# Altium PCB PCB.PcbDoc (part 1 of 3)
Units mil, origin at the board's own origin, x right, y up, seen from the top; angles counter-clockwise.
Board outline 6000 x 4000 mil, 2 copper layers (Top Layer, Bottom Layer); 274 components, 212 nets, 893 pads, 35 vias.
Unrouted connection lines stored in the file: 511.
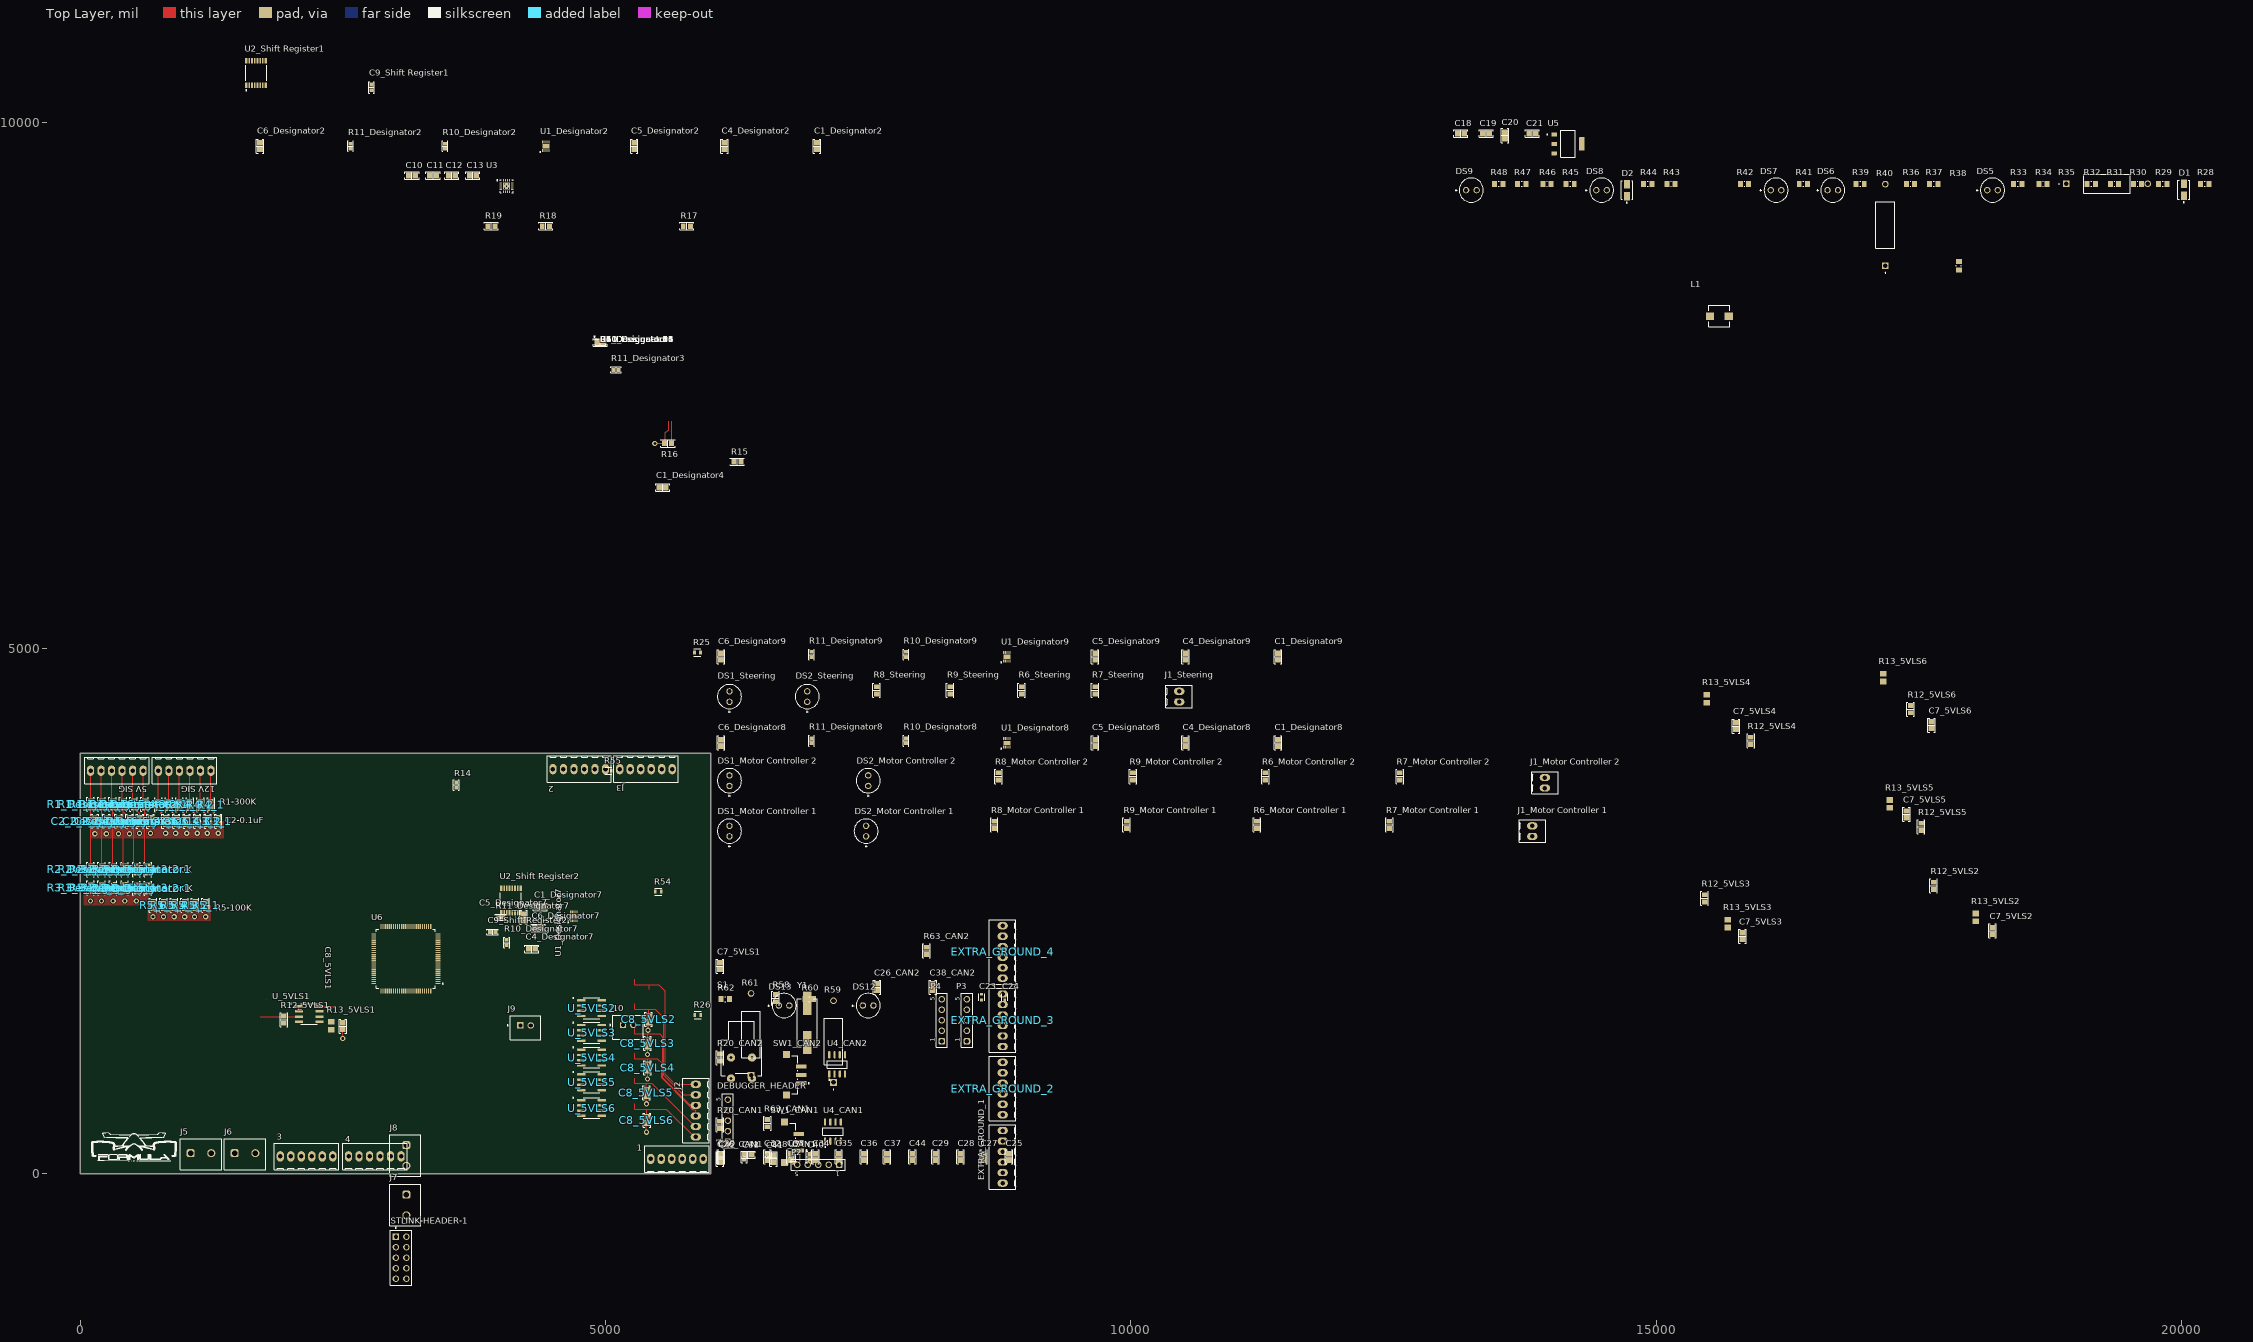
[diagram p0: Top Layer view]
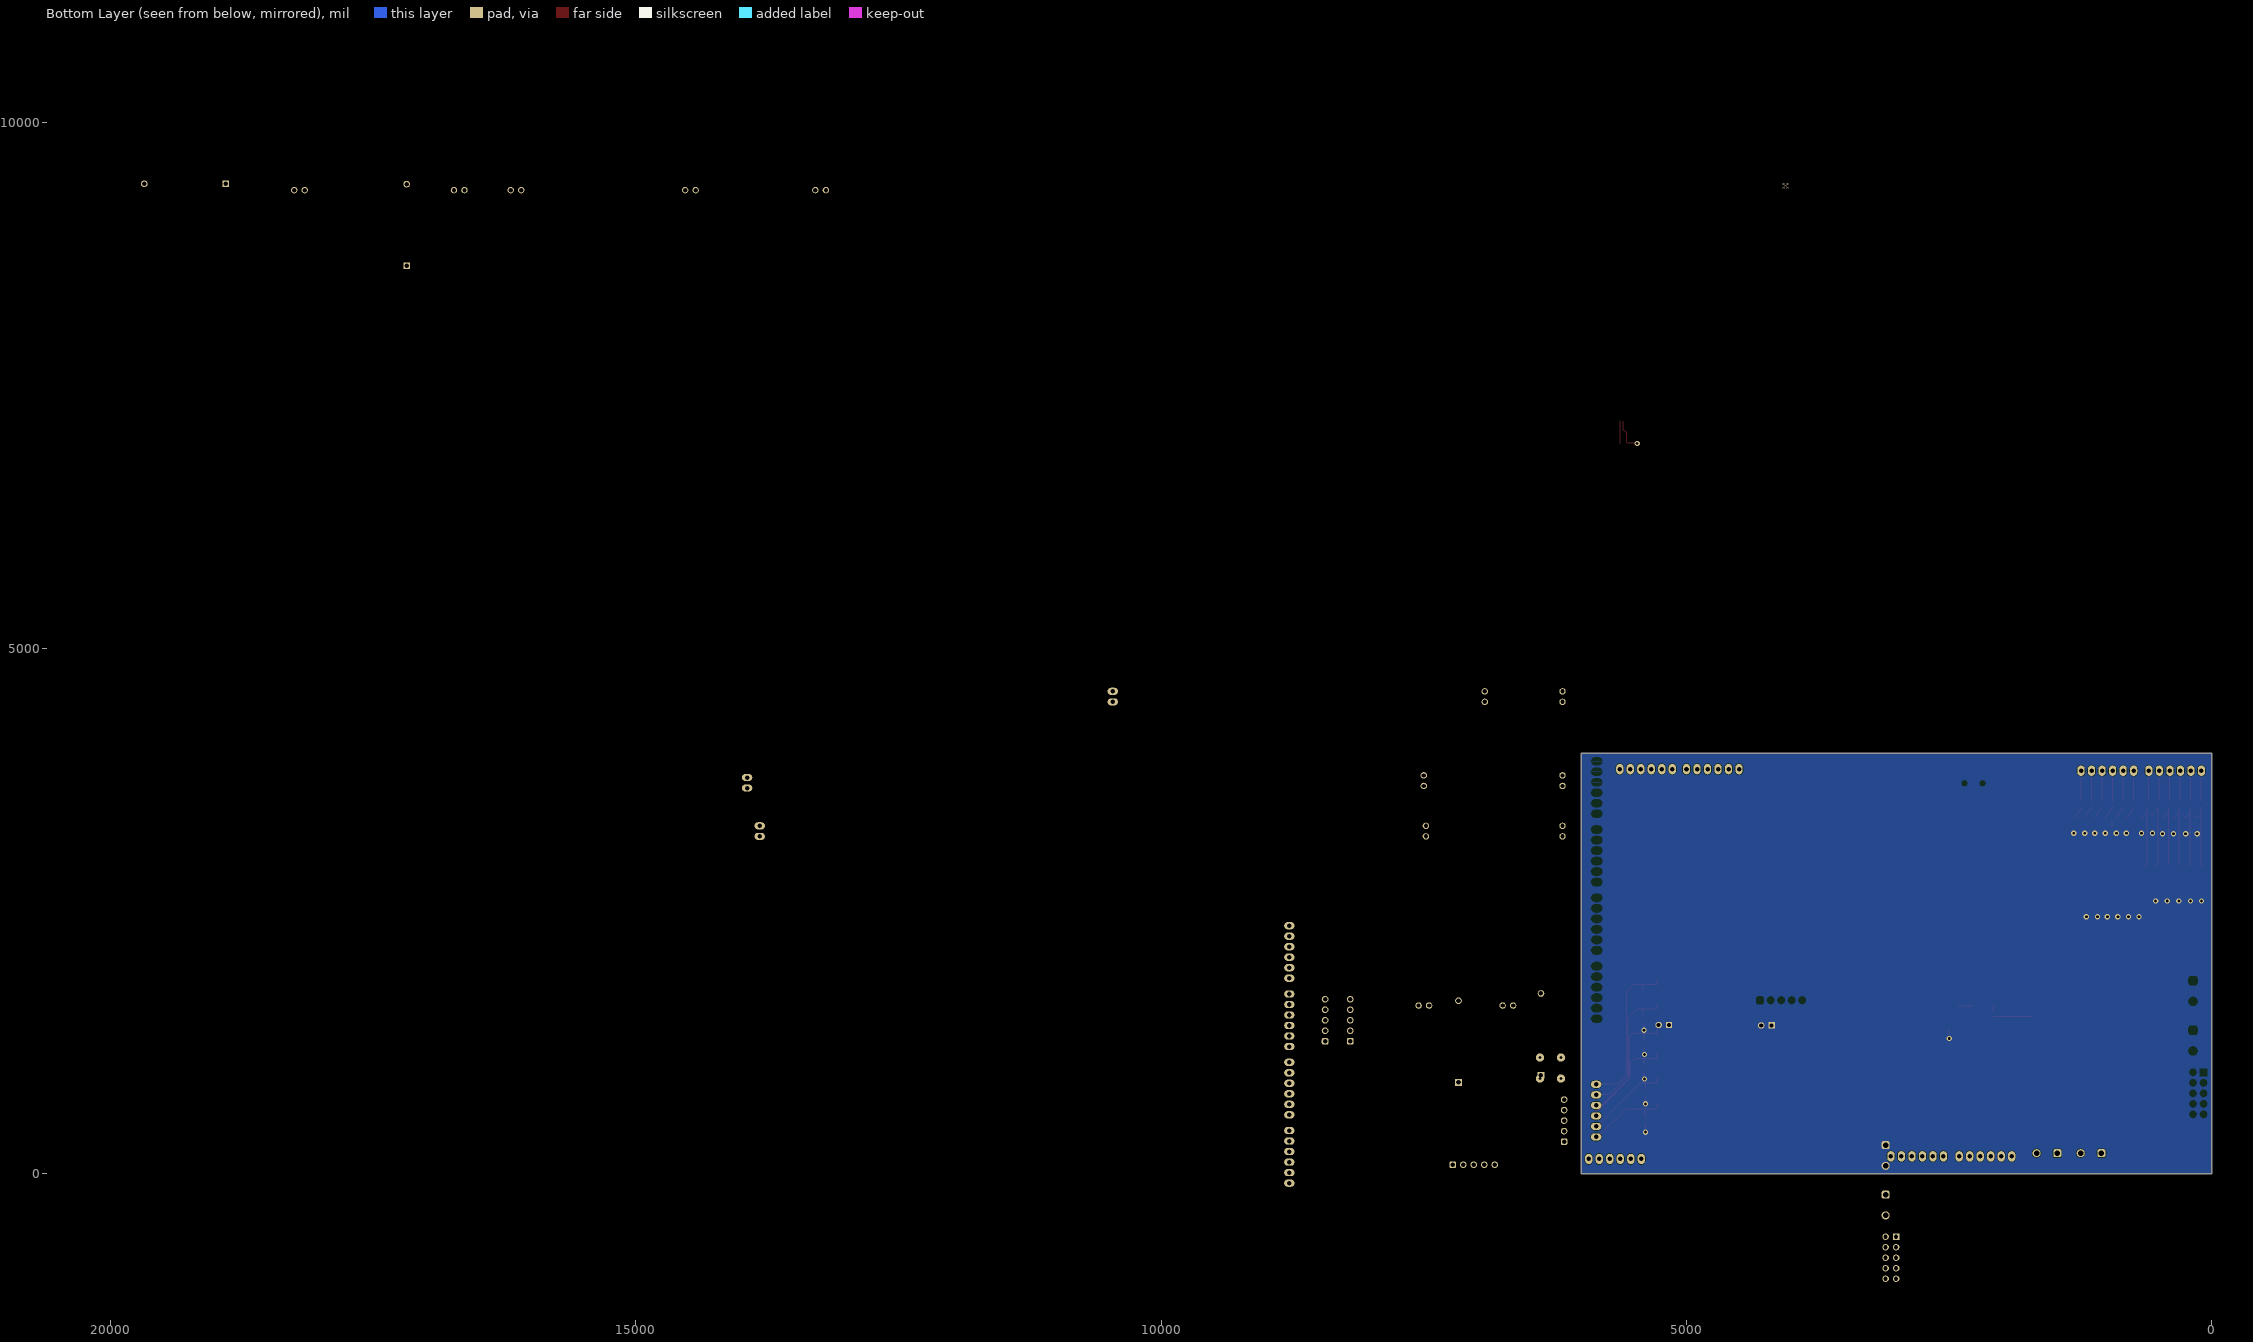
[diagram p1: Bottom Layer view, seen from below]

## Layer stack, top to bottom
Top Solder: solder mask 0.4, Solder Resist, Dk 3.5
Top Layer: signal copper 1.4
Dielectric 1: dielectric 12.6, FR-4, Dk 4.8
Bottom Layer: signal copper 1.4
Bottom Solder: solder mask 0.4, Solder Resist, Dk 3.5

## Board outline
0,0 6000,0 6000,4000 0,4000

## Design rules (kind name [scope] priority, off if disabled: settings)
BoardOutlineClearance [All] p1: gap=7.87 ignorepadtopadclearanceinfootprint=FALSE
Clearance [All] p1: gap=5 ignorepadtopadclearanceinfootprint=FALSE except(9.84: Arc-Hole Track-Hole SMDPad-Hole THPad-Hole Via-Hole Fill-Hole Poly-Hole Region-Hole Text-Hole)
ComponentClearance [All] p1: gap=5 collisioncheckmode=3 verticalgap=5 showdistances=TRUE
DiffPairsRouting [All] p1: maxlimit=10 minlimit=5 mostfreqgap=5 toplayer_minwidth=5 toplayer_maxwidth=1000 toplayer_prefwidth=5 bottomlayer_minwidth=5 bottomlayer_maxwidth=1000 bottomlayer_prefwidth=5 maxuncoupledlength=500
Height [All] p1: minheight=0 maxheight=71497.94 prefheight=500
HoleSize [All] p1: absolutevalues=TRUE maxlimit=248.03 minlimit=11.81 maxpercent=80.000 minpercent=20.000
HoleToHoleClearance [All] p1: gap=9.84 allowstackedmicrovias=FALSE
MinimumAnnularRing [All] p1: minimumring=3
MinimumSolderMaskSliver [All] p1: minsoldermaskwidth=0
PlaneClearance [All] p1: clearance=5
PlaneConnect PlaneConnectPowerPads [InPadClass('PowerPads')] p1: planeconnectstyle=Direct reliefexpansion=20 reliefentries=4 reliefconductorwidth=10 reliefairgap=10
PlaneConnect [All] p2: pad.planeconnectstyle=Relief pad.reliefexpansion=11.81 pad.reliefentries=4 pad.reliefconductorwidth=5 pad.reliefairgap=5 via.planeconnectstyle=Direct via.reliefexpansion=11.81 via.reliefentries=4 via.reliefconductorwidth=5 via.reliefairgap=5
PolygonConnect PolygonConnectPowerPads [All vs (InPadClass('PowerPads'))] p1: connectstyle=Direct reliefconductorwidth=10 reliefentries=4 polygonreliefangle="90 Angle" airgapwidth=10
PolygonConnect [All] p2: thpad.connectstyle=Relief thpad.reliefconductorwidth=5 thpad.reliefentries=4 thpad.polygonreliefangle="90 Angle" thpad.airgapwidth=5 smdpad.connectstyle=Relief smdpad.reliefconductorwidth=5 smdpad.reliefentries=4 smdpad.polygonreliefangle="90 Angle" smdpad.airgapwidth=5 via.connectstyle=Direct via.reliefconductorwidth=5 via.reliefentries=4 via.polygonreliefangle="90 Angle" via.airgapwidth=5
RoomDefinition TOP [InComponentClass('TOP')] p1: confinementstyle=ConfineIn formatcopy=TRUE lockcomponents=FALSE outline 1925,-1000 3925,-1000 3925,0 1925,0
RoutingVias [All] p1: holewidth=11.81 width=23.62 viastyle="Through Hole" minholewidth=11.81 minwidth=23.62 maxholewidth=23.62 maxwidth=259.84
SilkToSilkClearance [All] p1: silktosilkclearance=0
SilkToSolderMaskClearance [IsPad] p1: minsilkscreentomaskgap=5 clearancetoexposedcopper=TRUE
SolderMaskExpansion [All] p1: expansion=2.95 istentingtop=FALSE
Width [All] p1: maxlimit=1000 minlimit=5 preferedwidth=5 minimp=50.000000 maximp=50.000000 favimp=50.000000
20 further rules are at their usual default settings.

## Classes and differential pairs
component class Power: D1 D2 DS5 DS7 DS8 DS9 J5 J6 R28 R29 R30 R31 R32 R33 R34 R36 R37 R39 R40 R41 R42 R43 R44 R45 R46 R47 R48
channel class Single_12V: "Motor Controller 1" "Motor Controller 2" Steering
channel class CAN: CAN1 CAN2
component class TOP: DEBUGGER_HEADER EXTRA_GROUND_1 EXTRA_GROUND_2 EXTRA_GROUND_3 EXTRA_GROUND_4 J7 J8 P2 R25 R26 R54 R55 STLINK-HEADER-1
component class Steering: DS1_Steering DS2_Steering J1_Steering R6_Steering R7_Steering R8_Steering R9_Steering
component class "Motor Controller 2": "DS1_Motor Controller 2" "DS2_Motor Controller 2" "J1_Motor Controller 2" "R6_Motor Controller 2" "R7_Motor Controller 2" "R8_Motor Controller 2" "R9_Motor Controller 2"
component class "Motor Controller 1": "DS1_Motor Controller 1" "DS2_Motor Controller 1" "J1_Motor Controller 1" "R6_Motor Controller 1" "R7_Motor Controller 1" "R8_Motor Controller 1" "R9_Motor Controller 1"
component class Microcontroller: 3 4 C23 C24 C25 C26 C27 C28 C29 C30 C31 C32 C33 C34 C35 C36 C37 C44 DS12 DS13 P3 P4 R58 R59 R60 R61 R62 S1 U6 Y1
component class Designator9: C1_Designator9 C4_Designator9 C5_Designator9 C6_Designator9 R10_Designator9 R11_Designator9 U1_Designator9
component class Designator8: C1_Designator8 C4_Designator8 C5_Designator8 C6_Designator8 R10_Designator8 R11_Designator8 U1_Designator8
component class "CAN Connectors": J9 J10
component class CAN2: C26_CAN2 C38_CAN2 C39_CAN2 IC1_CAN2 R20_CAN2 R63_CAN2 S2_CAN2 SW1_CAN2 U4_CAN2
component class CAN1: C26_CAN1 C38_CAN1 C39_CAN1 IC1_CAN1 R20_CAN1 R63_CAN1 S2_CAN1 SW1_CAN1 U4_CAN1
component class "Accelerometer And Gyro": C40 C41 C42 C43 U7
component class "12V Power And Ground": 2 J3
component class "12 Volt Signal Bulkhead": "12V SIG"
component class "5V Power And Ground": 1 J2 R14
component class LDO: C18 C19 C20 C21 DS6 R35 R38 U5
component class Designator7: C1_Designator7 C4_Designator7 C5_Designator7 C6_Designator7 R10_Designator7 R11_Designator7 U1_Designator7
channel class shiftRegister: "Shift Register1" "Shift Register2"
channel class 12V_LS: Designator1 Designator2 Designator3 Designator4 Designator5 Designator6 Designator7 Designator8 Designator9
component class "Shift Register1": "C9_Shift Register1" "U2_Shift Register1"
component class Buck: C10 C11 C12 C13 D3 D4 L1 R15 R16 R17 R18 R19 U3
channel class 5V_LS: 5VLS1 5VLS2 5VLS3 5VLS4 5VLS5 5VLS6
component class "Shift Register2": "C9_Shift Register2" "U2_Shift Register2"
component class 5VLS6: C7_5VLS6 C8_5VLS6 R12_5VLS6 R13_5VLS6 U_5VLS6
component class 5VLS5: C7_5VLS5 C8_5VLS5 R12_5VLS5 R13_5VLS5 U_5VLS5
component class 5VLS4: C7_5VLS4 C8_5VLS4 R12_5VLS4 R13_5VLS4 U_5VLS4
component class 5VLS3: C7_5VLS3 C8_5VLS3 R12_5VLS3 R13_5VLS3 U_5VLS3
component class 5VLS2: C7_5VLS2 C8_5VLS2 R12_5VLS2 R13_5VLS2 U_5VLS2
component class 5VLS1: C7_5VLS1 C8_5VLS1 R12_5VLS1 R13_5VLS1 U_5VLS1
channel class 12_TO_3V3_VOLTAGE_DIVIDER: 1 2 3 4 5 6
component class 6: C3_6 R4_6 R5_6
component class 5: C3_5 R4_5 R5_5
component class 4: C3_4 R4_4 R5_4
component class 3: C3_3 R4_3 R5_3
component class 2: C3_2 R4_2 R5_2
component class 1: C3_1 R4_1 R5_1
channel class 5V_TO_3V_VD: Designator1 Designator2 Designator3 Designator4 Designator5 Designator6
component class "5 Volt Signal Bulkhead": "5V SIG"
component class Designator6: C2_Designator6 R1_Designator6 R2_Designator6 R3_Designator6
component class Designator5: C2_Designator5 R1_Designator5 R2_Designator5 R3_Designator5
component class Designator4: C2_Designator4 R1_Designator4 R2_Designator4 R3_Designator4
component class Designator3: C2_Designator3 R1_Designator3 R2_Designator3 R3_Designator3
component class Designator2: C2_Designator2 R1_Designator2 R2_Designator2 R3_Designator2
component class Designator1: C2_Designator1 R1_Designator1 R2_Designator1 R3_Designator1
differential pair CAN2: +CAN2_P -CAN2_N
differential pair CAN1: +CAN1_P -CAN1_N

## Components (designator, comment, footprint, x,y, rotation, side; value= is the part's Value field where it differs from the comment)
1 "282834-6" "TE 282834-6" 5680,140 r180 top
2 "282834-6" "TE 282834-6" 4750,3850 r0 top
3 "282834-6" "TE 282834-6" 2155,165 r180 top
4 "282834-6" "TE 282834-6" 2805,165 r180 top
"5V SIG" "282834-6" "TE 282834-6" 350,3835 r0 top
"12V SIG" "282834-6" "TE 282834-6" 995,3835 r0 top
C1_Designator1 "1µF" "CAP 0805_2012" 4950.76,7911.67 r0 top (schematic designator C1)
C1_Designator2 "1µF" "CAP 0805_2012" 7013.62,9778 r90 top (schematic designator C1)
C1_Designator3 "1µF" "CAP 0805_2012" 4950.76,7911.67 r0 top (schematic designator C1)
C1_Designator4 "1µF" "CAP 0805_2012" 5543.5,6530 r0 top (schematic designator C1)
C1_Designator5 "1µF" "CAP 0805_2012" 4950.76,7911.67 r0 top (schematic designator C1)
C1_Designator6 "1µF" "CAP 0805_2012" 4950.76,7911.67 r0 top (schematic designator C1)
C1_Designator7 "1µF" "CAP 0805_2012" 4380,2540 r0 top (schematic designator C1)
C1_Designator8 "1µF" "CAP 0805_2012" 11400,4100 r90 top (schematic designator C1)
C1_Designator9 "1µF" "CAP 0805_2012" 11400,4920 r90 top (schematic designator C1)
C2_Designator1 "0.1 µF" "CAP 0805_2012" 670,3355 r90 top (schematic designator C2)
C2_Designator2 "0.1 µF" "CAP 0805_2012" 570,3355 r90 top (schematic designator C2)
C2_Designator3 "0.1 µF" "CAP 0805_2012" 470,3355 r90 top (schematic designator C2)
C2_Designator4 "0.1 µF" "CAP 0805_2012" 365,3353.5 r90 top (schematic designator C2)
C2_Designator5 "0.1 µF" "CAP 0805_2012" 250,3353.5 r90 top (schematic designator C2)
C2_Designator6 "0.1 µF" "CAP 0805_2012" 140,3353.5 r90 top (schematic designator C2)
C3_1 "0.1 µF" "CAP 0805_2012" 1315,3355 r90 top (schematic designator C3)
C3_2 "0.1 µF" "CAP 0805_2012" 1215,3355 r90 top (schematic designator C3)
C3_3 "0.1 µF" "CAP 0805_2012" 1115,3355 r90 top (schematic designator C3)
C3_4 "0.1 µF" "CAP 0805_2012" 1015,3355 r90 top (schematic designator C3)
C3_5 "0.1 µF" "CAP 0805_2012" 915,3355 r90 top (schematic designator C3)
C3_6 "0.1 µF" "CAP 0805_2012" 815,3355 r90 top (schematic designator C3)
C4_Designator1 "1µF" "CAP 0805_2012" 4950.76,7911.67 r0 top (schematic designator C4)
C4_Designator2 "1µF" "CAP 0805_2012" 6133.62,9778 r90 top (schematic designator C4)
C4_Designator3 "1µF" "CAP 0805_2012" 4950.76,7911.67 r0 top (schematic designator C4)
C4_Designator4 "1µF" "CAP 0805_2012" 4950.76,7911.67 r0 top (schematic designator C4)
C4_Designator5 "1µF" "CAP 0805_2012" 4950.76,7911.67 r0 top (schematic designator C4)
C4_Designator6 "1µF" "CAP 0805_2012" 4950.76,7911.67 r0 top (schematic designator C4)
C4_Designator7 "1µF" "CAP 0805_2012" 4300,2140 r0 top (schematic designator C4)
C4_Designator8 "1µF" "CAP 0805_2012" 10520,4100 r90 top (schematic designator C4)
C4_Designator9 "1µF" "CAP 0805_2012" 10520,4920 r90 top (schematic designator C4)
C5_Designator1 "0.22µF" "CAP 0805_2012" 4950.76,7911.67 r0 top (schematic designator C5)
C5_Designator2 "0.22µF" "CAP 0805_2012" 5273.62,9778 r90 top (schematic designator C5)
C5_Designator3 "0.22µF" "CAP 0805_2012" 4950.76,7911.67 r0 top (schematic designator C5)
C5_Designator4 "0.22µF" "CAP 0805_2012" 4950.76,7911.67 r0 top (schematic designator C5)
C5_Designator5 "0.22µF" "CAP 0805_2012" 4950.76,7911.67 r0 top (schematic designator C5)
C5_Designator6 "0.22µF" "CAP 0805_2012" 4950.76,7911.67 r0 top (schematic designator C5)
C5_Designator7 "0.22µF" "CAP 0805_2012" 4220,2440 r90 top (schematic designator C5)
C5_Designator8 "0.22µF" "CAP 0805_2012" 9660,4100 r90 top (schematic designator C5)
C5_Designator9 "0.22µF" "CAP 0805_2012" 9660,4920 r90 top (schematic designator C5)
C6_Designator1 "0.1 µF" "CAP 0805_2012" 4950.76,7911.67 r0 top (schematic designator C6)
C6_Designator2 "0.1 µF" "CAP 0805_2012" 1713.62,9778 r90 top (schematic designator C6)
C6_Designator3 "0.1 µF" "CAP 0805_2012" 4950.76,7911.67 r0 top (schematic designator C6)
C6_Designator4 "0.1 µF" "CAP 0805_2012" 4950.76,7911.67 r0 top (schematic designator C6)
C6_Designator5 "0.1 µF" "CAP 0805_2012" 4950.76,7911.67 r0 top (schematic designator C6)
C6_Designator6 "0.1 µF" "CAP 0805_2012" 4950.76,7911.67 r0 top (schematic designator C6)
C6_Designator7 "0.1 µF" "CAP 0805_2012" 4360,2340 r0 top (schematic designator C6)
C6_Designator8 "0.1 µF" "CAP 0805_2012" 6100,4100 r90 top (schematic designator C6)
C6_Designator9 "0.1 µF" "CAP 0805_2012" 6100,4920 r90 top (schematic designator C6)
C7_5VLS1 "1µF" "CAP 0805_2012" 6090,1975 r90 top (schematic designator C7)
C7_5VLS2 "1µF" "CAP 0805_2012" 18200,2311.5 r90 top (schematic designator C7)
C7_5VLS3 "1µF" "CAP 0805_2012" 15820,2260 r90 top (schematic designator C7)
C7_5VLS4 "1µF" "CAP 0805_2012" 15760,4260 r90 top (schematic designator C7)
C7_5VLS5 "1µF" "CAP 0805_2012" 17380,3420 r90 top (schematic designator C7)
C7_5VLS6 "1µF" "CAP 0805_2012" 17620,4268.5 r90 top (schematic designator C7)
C8_5VLS1 "0.1 µF" "CAP 0805_2012" 2500,1405 r90 top (schematic designator C8)
C8_5VLS2 "0.1 µF" "CAP 0805_2012" 5410,1468.5 r90 top (schematic designator C8)
C8_5VLS3 "0.1 µF" "CAP 0805_2012" 5400,1240 r90 top (schematic designator C8)
C8_5VLS4 "0.1 µF" "CAP 0805_2012" 5400,1008.5 r90 top (schematic designator C8)
C8_5VLS5 "0.1 µF" "CAP 0805_2012" 5390,768.5 r90 top (schematic designator C8)
C8_5VLS6 "0.1 µF" "CAP 0805_2012" 5395,510 r90 top (schematic designator C8)
"C9_Shift Register1" "0.1 µF" "CAP 0603_1608" 2773.62,10338 r90 top (schematic designator C9)
"C9_Shift Register2" "0.1 µF" "CAP 0603_1608" 3926.57,2300 r0 top (schematic designator C9)
C10 "10 µF" "CAP 0805_2012" 3158.62,9498 r0 top
C11 "0.1 µF" "CAP 0805_2012" 3358.62,9498 r0 top
C12 "3300 pF" "CAP 0805_2012" 3538.62,9498 r0 top
C13 "22 µF" "CAP 0805_2012" 3738.62,9498 r0 top
C18 "10 µF" "CAP 0805_2012" 13140,9900 r0 top
C19 "0.1 µF" "CAP 0805_2012" 13380,9900 r0 top
C20 "100 µF" "CAP 0805_2012" 13560,9880 r90 top
C21 "0.1 µF" "CAP 0805_2012" 13820,9900 r0 top
C23 "GRM188R71A225KE15D" FP-GRM188-0_1-e0_2_0_5-MFG 8580,1680 r90 top
C24 "GRM188R71A225KE15D" FP-GRM188-0_1-e0_2_0_5-MFG 8800,1680 r90 top
C25 "8 pF" "CAP 0805_2012" 8840,160 r90 top
C26_CAN1 "0.1 µF" "CAP 0805_2012" 6090,140 r90 top (schematic designator C26)
C26_CAN2 "0.1 µF" "CAP 0805_2012" 7585,1775 r90 top (schematic designator C26)
C27 "8 pF" "CAP 0805_2012" 8600,160 r90 top
C28 "0.1 µF" "CAP 0805_2012" 8380,160 r90 top
C29 "0.1 µF" "CAP 0805_2012" 8140,160 r90 top
C30 "0.1 µF" "CAP 0805_2012" 6100,160 r90 top
C31 "0.1 µF" "CAP 0805_2012" 6360,180 r0 top
C32 "0.1 µF" "CAP 0805_2012" 6540,160 r90 top
C33 "0.1 µF" "CAP 0805_2012" 6760,160 r90 top
C34 "0.1 µF" "CAP 0805_2012" 7000,160 r90 top
C35 "1µF" "CAP 0805_2012" 7220,160 r90 top
C36 "1µF" "CAP 0805_2012" 7460,160 r90 top
C37 "1µF" "CAP 0805_2012" 7680,160 r90 top
C38_CAN1 "0.1 µF" "CAP 0805_2012" 6600,140 r90 top (schematic designator C38)
C38_CAN2 "0.1 µF" "CAP 0805_2012" 8115,1775 r90 top (schematic designator C38)
C40 "0.1 µF" "CAP 0603_1608" 6940,160 r90 top
C41 "10000 pF" "CAP 0603_1608" 6580,180 r0 top
C42 "0.1 µF" "CAP 0603_1608" 6100,160 r90 top
C43 "2.2 µF" "CAP 0603_1608" 6320,160 r90 top
C44 "4.7 µF" "CAP 0805_2012" 7920,160 r90 top
D1 "SMAJ14A-E3/61" VISH-DO-214AC-2_L 20020,9363.9 r90 top
D2 "SMAJ14A-E3/61" VISH-DO-214AC-2_L 14720,9360 r90 top
DEBUGGER_HEADER "61300511121" 61300511121 6165,505 r90 top
"DS1_Motor Controller 1" "HLMP-4740" AVAG-HLMP-4740 6180,3260 r90 top (schematic designator DS1)
"DS1_Motor Controller 2" "HLMP-4740" AVAG-HLMP-4740 6180,3740 r90 top (schematic designator DS1)
DS1_Steering "HLMP-4740" AVAG-HLMP-4740 6180,4540 r90 top (schematic designator DS1)
"DS2_Motor Controller 1" "HLMP-4740" AVAG-HLMP-4740 7480,3260 r90 top (schematic designator DS2)
"DS2_Motor Controller 2" "HLMP-4740" AVAG-HLMP-4740 7500,3740 r90 top (schematic designator DS2)
DS2_Steering "HLMP-4740" AVAG-HLMP-4740 6920,4540 r90 top (schematic designator DS2)
DS5 "HLMP-4740" AVAG-HLMP-4740 18200,9360 r0 top
DS6 "HLMP-4740" AVAG-HLMP-4740 16680,9360 r0 top
DS7 "HLMP-4740" AVAG-HLMP-4740 16140,9360 r0 top
DS8 "HLMP-4740" AVAG-HLMP-4740 14480,9360 r0 top
DS9 "HLMP-4740" AVAG-HLMP-4740 13240,9360 r0 top
DS12 "HLMP-4740" AVAG-HLMP-4740 7500,1600 r0 top
DS13 "HLMP-4740" AVAG-HLMP-4740 6700,1600 r0 top
EXTRA_GROUND_1 "282834-6" "TE 282834-6" 8780,160 r270 top
EXTRA_GROUND_2 "282834-6" "TE 282834-6" 8780,810 r270 top
EXTRA_GROUND_3 "282834-6" "TE 282834-6" 8780,1460 r270 top
EXTRA_GROUND_4 "282834-6" "TE 282834-6" 8780,2110 r270 top
"J1_Motor Controller 1" "282834-2" "TE 282834-2" 13820,3260 r90 top (schematic designator J1)
"J1_Motor Controller 2" "282834-2" "TE 282834-2" 13940,3720 r90 top (schematic designator J1)
J1_Steering "282834-2" "TE 282834-2" 10460,4540 r90 top (schematic designator J1)
J2 "282834-6" "TE 282834-6" 5860,600 r270 top
J3 "282834-6" "TE 282834-6" 5385,3850 r0 top
J5 "691137710002" 691137710002 1150,185 r0 top
J6 "691137710002" 691137710002 1570,185 r0 top
J7 "691137710002" 691137710002 3095.16,-298.43 r270 top
J8 "691137710002" 691137710002 3095.16,173.43 r270 top
J9 "B2B-XH-A(LF)(SN)" FP-B2B-XH-A_LF_SN-MFG 4240,1390 r0 top
J10 "B2B-XH-A(LF)(SN)" FP-B2B-XH-A_LF_SN-MFG 5215.79,1394.33 r0 top
L1 "2.2 µH" "BOURNS SRP5030T" 15600,8160 r0 top
P2 "61300511121" 61300511121 7025,85 r180 top
P3 "61300511121" 61300511121 8440,1460 r90 top
P4 "61300511121" 61300511121 8200,1460 r90 top
R1_Designator1 "300 kOhms" "RES 0805_2012" 615,3515 r90 top (schematic designator R1)
R1_Designator2 "300 kOhms" "RES 0805_2012" 510,3515.55 r90 top (schematic designator R1)
R1_Designator3 "300 kOhms" "RES 0805_2012" 410,3515.55 r90 top (schematic designator R1)
R1_Designator4 "300 kOhms" "RES 0805_2012" 310,3515 r90 top (schematic designator R1)
R1_Designator5 "300 kOhms" "RES 0805_2012" 205,3515 r90 top (schematic designator R1)
R1_Designator6 "300 kOhms" "RES 0805_2012" 100,3515.55 r90 top (schematic designator R1)
R2_Designator1 "300 kOhms" "RES 0805_2012" 645,2895 r90 top (schematic designator R2)
R2_Designator2 "300 kOhms" "RES 0805_2012" 535,2895 r90 top (schematic designator R2)
R2_Designator3 "300 kOhms" "RES 0805_2012" 425,2895 r90 top (schematic designator R2)
R2_Designator4 "300 kOhms" "RES 0805_2012" 315,2895 r90 top (schematic designator R2)
R2_Designator5 "300 kOhms" "RES 0805_2012" 205,2895 r90 top (schematic designator R2)
R2_Designator6 "300 kOhms" "RES 0805_2012" 100,2895 r90 top (schematic designator R2)
R3_Designator1 "150 kOhms" "RES 0805_2012" 645,2715 r90 top (schematic designator R3)
R3_Designator2 "150 kOhms" "RES 0805_2012" 535,2715 r90 top (schematic designator R3)
R3_Designator3 "150 kOhms" "RES 0805_2012" 425,2720 r90 top (schematic designator R3)
R3_Designator4 "150 kOhms" "RES 0805_2012" 315,2720 r90 top (schematic designator R3)
R3_Designator5 "150 kOhms" "RES 0805_2012" 205,2720 r90 top (schematic designator R3)
R3_Designator6 "150 kOhms" "RES 0805_2012" 100,2720 r90 top (schematic designator R3)
R4_1 "300 kOhms" "RES 0805_2012" 1245,3510 r90 top (schematic designator R4)
R4_2 "300 kOhms" "RES 0805_2012" 1145,3510 r90 top (schematic designator R4)
R4_3 "300 kOhms" "RES 0805_2012" 1045,3510 r90 top (schematic designator R4)
R4_4 "300 kOhms" "RES 0805_2012" 945,3510 r90 top (schematic designator R4)
R4_5 "300 kOhms" "RES 0805_2012" 845,3510 r90 top (schematic designator R4)
R4_6 "300 kOhms" "RES 0805_2012" 745,3510 r90 top (schematic designator R4)
R5_1 "100 kOhms" "RES 0805_2012" 1195,2555 r90 top (schematic designator R5)
R5_2 "100 kOhms" "RES 0805_2012" 1095,2555 r90 top (schematic designator R5)
R5_3 "100 kOhms" "RES 0805_2012" 995,2555 r90 top (schematic designator R5)
R5_4 "100 kOhms" "RES 0805_2012" 895,2555 r90 top (schematic designator R5)
R5_5 "100 kOhms" "RES 0805_2012" 795,2555 r90 top (schematic designator R5)
R5_6 "100 kOhms" "RES 0805_2012" 695,2555 r90 top (schematic designator R5)
"R6_Motor Controller 1" "3 kOhms" "RES 0805_2012" 11200,3320 r90 top (schematic designator R6)
"R6_Motor Controller 2" "3 kOhms" "RES 0805_2012" 11280,3780 r90 top (schematic designator R6)
R6_Steering "3 kOhms" "RES 0805_2012" 8960,4600 r90 top (schematic designator R6)
"R7_Motor Controller 1" "3 kOhms" "RES 0805_2012" 12460,3320 r90 top (schematic designator R7)
"R7_Motor Controller 2" "3 kOhms" "RES 0805_2012" 12560,3780 r90 top (schematic designator R7)
R7_Steering "3 kOhms" "RES 0805_2012" 9660,4600 r90 top (schematic designator R7)
"R8_Motor Controller 1" "2 kOhms" "RES 0805_2012" 8700,3320 r90 top (schematic designator R8)
"R8_Motor Controller 2" "2 kOhms" "RES 0805_2012" 8740,3780 r90 top (schematic designator R8)
R8_Steering "2 kOhms" "RES 0805_2012" 7580,4600 r90 top (schematic designator R8)
"R9_Motor Controller 1" "2 kOhms" "RES 0805_2012" 9960,3320 r90 top (schematic designator R9)
"R9_Motor Controller 2" "2 kOhms" "RES 0805_2012" 10020,3780 r90 top (schematic designator R9)
R9_Steering "2 kOhms" "RES 0805_2012" 8280,4600 r90 top (schematic designator R9)
R10_Designator1 "100 kOhms" "RES 0603_1608" 4950.76,7911.67 r0 top (schematic designator R10)
R10_Designator2 "100 kOhms" "RES 0603_1608" 3473.62,9778 r90 top (schematic designator R10)
R10_Designator3 "100 kOhms" "RES 0603_1608" 4950.76,7911.67 r0 top (schematic designator R10)
R10_Designator4 "100 kOhms" "RES 0603_1608" 4950.76,7911.67 r0 top (schematic designator R10)
R10_Designator5 "100 kOhms" "RES 0603_1608" 4950.76,7911.67 r0 top (schematic designator R10)
R10_Designator6 "100 kOhms" "RES 0603_1608" 4950.76,7911.67 r0 top (schematic designator R10)
R10_Designator7 "100 kOhms" "RES 0603_1608" 4060,2200 r90 top (schematic designator R10)
R10_Designator8 "100 kOhms" "RES 0603_1608" 7860,4120 r90 top (schematic designator R10)
R10_Designator9 "100 kOhms" "RES 0603_1608" 7860,4940 r90 top (schematic designator R10)
R11_Designator1 "10 kOhms" "RES 0603_1608" 4950.76,7911.67 r0 top (schematic designator R11)
R11_Designator2 "10 kOhms" "RES 0603_1608" 2573.62,9778 r90 top (schematic designator R11)
R11_Designator3 "10 kOhms" "RES 0603_1608" 5100.59,7650 r0 top (schematic designator R11)
R11_Designator4 "10 kOhms" "RES 0603_1608" 4950.76,7911.67 r0 top (schematic designator R11)
R11_Designator5 "10 kOhms" "RES 0603_1608" 4950.76,7911.67 r0 top (schematic designator R11)
R11_Designator6 "10 kOhms" "RES 0603_1608" 4950.76,7911.67 r0 top (schematic designator R11)
R11_Designator7 "10 kOhms" "RES 0603_1608" 4000,2440 r0 top (schematic designator R11)
R11_Designator8 "10 kOhms" "RES 0603_1608" 6960,4120 r90 top (schematic designator R11)
R11_Designator9 "10 kOhms" "RES 0603_1608" 6960,4940 r90 top (schematic designator R11)
R12_5VLS1 "10 kOhms" "RES 0805_2012" 1940,1465 r270 top (schematic designator R12)
R12_5VLS2 "10 kOhms" "RES 0805_2012" 17640,2740 r90 top (schematic designator R12)
R12_5VLS3 "10 kOhms" "RES 0805_2012" 15460,2620 r90 top (schematic designator R12)
R12_5VLS4 "10 kOhms" "RES 0805_2012" 15900,4120 r90 top (schematic designator R12)
R12_5VLS5 "10 kOhms" "RES 0805_2012" 17520,3300 r90 top (schematic designator R12)
R12_5VLS6 "10 kOhms" "RES 0805_2012" 17420,4420 r90 top (schematic designator R12)
R13_5VLS1 "5.62 kOhms" RESC2013X60X40ML20T25 2390,1407.6 r90 top (schematic designator R13)
R13_5VLS2 "5.62 kOhms" RESC2013X60X40ML20T25 18040,2440 r90 top (schematic designator R13)
R13_5VLS3 "5.62 kOhms" RESC2013X60X40ML20T25 15680,2380 r90 top (schematic designator R13)
R13_5VLS4 "5.62 kOhms" RESC2013X60X40ML20T25 15480,4520 r90 top (schematic designator R13)
R13_5VLS5 "5.62 kOhms" RESC2013X60X40ML20T25 17220,3520 r90 top (schematic designator R13)
R13_5VLS6 "5.62 kOhms" RESC2013X60X40ML20T25 17160,4720 r90 top (schematic designator R13)
R14 "100 kOhms" "RES 0603_1608" 3580,3700 r90 top
R15 "84.5 Ohms" "RES 0805_2012" 6254.45,6775 r0 top
R16 "100 kOhms" "RES 0805_2012" 5595,6950 r0 top
R17 "20.5 Ohms" "RES 0805_2012" 5773.62,9018 r0 top
R18 "10 Ohms" "RES 0805_2012" 4433.62,9018 r0 top
R19 "10 Ohms" "RES 0805_2012" 3913.62,9018 r0 top
R20_CAN1 "120 Ohms" "RES 0805_2012" 6090,465 r90 top (schematic designator R20)
R20_CAN2 "120 Ohms" "RES 0805_2012" 6090,1105 r90 top (schematic designator R20)
R25 "RMCF0603ZT0R00" FP-RMCF0603-MFG 5875,4960 r180 top value=0mΩ
R26 "RMCF0603ZT0R00" FP-RMCF0603-MFG 5878.54,1510 r180 top value=0mΩ
R28 "RC0805FR-071KL" RESC2013X60X35ML10T20 20220,9420 r0 top
R29 "RC0805FR-071KL" RESC2013X60X35ML10T20 19820,9420 r0 top
R30 "RC0805FR-071KL" RESC2013X60X35ML10T20 19580,9420 r0 top
R31 "RC0805FR-071KL" RESC2013X60X35ML10T20 19360,9420 r0 top
R32 "RC0805FR-071KL" RESC2013X60X35ML10T20 19140,9420 r0 top
R33 "RC0805FR-071KL" RESC2013X60X35ML10T20 18440,9420 r0 top
R34 "RC0805FR-071KL" RESC2013X60X35ML10T20 18680,9420 r0 top
R35 "AC01000005000JA100" RES_AC01_VIS 18900,9420 r0 top
R36 "RC0805FR-071KL" RESC2013X60X35ML10T20 17420,9420 r0 top
R37 "RC0805FR-071KL" RESC2013X60X35ML10T20 17640,9420 r0 top
R38 "RC0805FR-071KL" RESC2013X60X35ML10T20 17880,8640 r90 top
R39 "RC0805FR-071KL" RESC2013X60X35ML10T20 16940,9420 r0 top
R40 "AC01000005000JA100" RES_AC01_VIS 17180,8640 r90 top
R41 "RC0805FR-071KL" RESC2013X60X35ML10T20 16400,9420 r0 top
R42 "RC0805FR-071KL" RESC2013X60X35ML10T20 15840,9420 r0 top
R43 "RC0805FR-071KL" RESC2013X60X35ML10T20 15140,9420 r0 top
R44 "RC0805FR-071KL" RESC2013X60X35ML10T20 14920,9420 r0 top
R45 "RC0805FR-071KL" RESC2013X60X35ML10T20 14180,9420 r0 top
R46 "RC0805FR-071KL" RESC2013X60X35ML10T20 13960,9420 r0 top
R47 "RC0805FR-071KL" RESC2013X60X35ML10T20 13720,9420 r0 top
R48 "RC0805FR-071KL" RESC2013X60X35ML10T20 13500,9420 r0 top
R54 "RMCF0603ZT0R00" FP-RMCF0603-MFG 5503.54,2685 r180 top value=0mΩ
R55 "RMCF0603ZT0R00" FP-RMCF0603-MFG 5025,3835 r180 top value=0mΩ
R58 "10 kOhms" "RES 0805_2012" 6620,1670 r90 top
R59 "AC01000005000JA100" RES_AC01_VIS 7170,868 r90 top
R60 "RC0805FR-071KL" RESC2013X60X35ML10T20 6940,1660 r0 top
R61 "AC01000005000JA100" RES_AC01_VIS 6385,938 r90 top
R62 "RC0805FR-071KL" RESC2013X60X35ML10T20 6140,1660 r0 top
R63_CAN1 "120 Ohms" "RES 0805_2012" 6540,480 r90 top (schematic designator R63)
R63_CAN2 "120 Ohms" "RES 0805_2012" 8055,2120 r90 top (schematic designator R63)
S1 "AB11AH-HC" "NKK AB11AH-HC" 6295,1105 r0 top
STLINK-HEADER-1 "826925-5" FP-826925-5-MFG 3055,-800 r270 top
SW1_CAN1 "SS312SAH4-R" FP-SS312SAH4-R-MFG 6730,300 r0 top (schematic designator SW1)
SW1_CAN2 "SS312SAH4-R" FP-SS312SAH4-R-MFG 6750,940 r0 top (schematic designator SW1)
U1_Designator1 "NCP45524IMNTWG-H" SON50P200X200X100-9N 4950.76,7911.67 r0 top (schematic designator U1)
U1_Designator2 "NCP45524IMNTWG-H" SON50P200X200X100-9N 4433.62,9778 r90 top (schematic designator U1)
U1_Designator3 "NCP45524IMNTWG-H" SON50P200X200X100-9N 4950.76,7911.67 r0 top (schematic designator U1)
U1_Designator4 "NCP45524IMNTWG-H" SON50P200X200X100-9N 4950.76,7911.67 r0 top (schematic designator U1)
U1_Designator5 "NCP45524IMNTWG-H" SON50P200X200X100-9N 4950.76,7911.67 r0 top (schematic designator U1)
U1_Designator6 "NCP45524IMNTWG-H" SON50P200X200X100-9N 4950.76,7911.67 r0 top (schematic designator U1)
U1_Designator7 "NCP45524IMNTWG-H" SON50P200X200X100-9N 4699.53,2448.66 r90 top (schematic designator U1)
U1_Designator8 "NCP45524IMNTWG-H" SON50P200X200X100-9N 8820,4100 r90 top (schematic designator U1)
U1_Designator9 "NCP45524IMNTWG-H" SON50P200X200X100-9N 8820,4920 r90 top (schematic designator U1)
"U2_Shift Register1" "74HC595PW,118" FP-SOT403-1-MFG 1675,10475 r90 top (schematic designator U2)
"U2_Shift Register2" "74HC595PW,118" FP-SOT403-1-MFG 4100,2600 r90 top (schematic designator U2)
U3 "TPS62133RGTR" RGT0016C_V 4058.62,9398 r0 top
U4_CAN1 "MCP2542FDT-E/SN" FP-C04-057-SN-IPC_C 7165,400 r90 top (schematic designator U4)
U4_CAN2 "MCP2542FDT-E/SN" FP-C04-057-SN-IPC_C 7205,1040 r90 top (schematic designator U4)
U5 "AMS1117-3.3" SOT229P700X180-4N 14160,9800 r0 top
U6 "STM32F446VET6" FP-LQFP100-1L-MFG 3100,2045 r180 top
U7 "ICM-20602" INSE-I62-16 6800,160 r0 top
U_5VLS1 "ST890CDR" SOIC127P600X175-8N 2180,1520 r0 top (schematic designator U)
U_5VLS2 "ST890CDR" SOIC127P600X175-8N 4867.44,1575 r0 top (schematic designator U)
U_5VLS3 "ST890CDR" SOIC127P600X175-8N 4867.44,1340 r0 top (schematic designator U)
U_5VLS4 "ST890CDR" SOIC127P600X175-8N 4867.56,1105 r0 top (schematic designator U)
U_5VLS5 "ST890CDR" SOIC127P600X175-8N 4867.56,870 r0 top (schematic designator U)
U_5VLS6 "ST890CDR" SOIC127P600X175-8N 4867.56,625 r0 top (schematic designator U)
Y1 "8 MHz" "ABRACON ABLS" 6920,1435 r90 top

## Footprints (in the part's own frame and the unit in brackets; to place one, negate y for a bottom-side part, rotate by r counter-clockwise, add the part's x,y. Pads: shape width x height; smd on the part's side, far side on the other; paste and mask are expansions set on the pad)
61300511121 [mm] "Pin Header, pitch 2.54 mm, THT, Vertical, single row, 5p"
  rrect50% 1.6x1.6 hole 1.1: 1(-5.08,0)
  round 1.6 hole 1.1: 2(-2.54,0) 3(0,0) 4(2.54,0) 5(5.08,0)
  silkscreen extent -6.5,-1.35 6.5,1.35, body extent -6.35,-1.27 6.35,1.27, height 8.57
691137710002 [mm] "Horizontal Cable Entry with Pressure Clamp, pitch 5mm, 02p"
  rrect50% 1.95x1.95 hole 1.3: 1(-2.5,0.25)
  round 1.95 hole 1.3: 2(2.5,0.25)
  silkscreen extent -5,-3.75 5,3.75, body extent -5,-3.75 5,3.75, height 11.6
"ABRACON ABLS" [mm] "Crystal, 2-Leads, Body 4.70x11.40mm, Pitch 8.80mm, IPC Medium Density"
  rect 5.6x2.1 smd: 1(-4.75,0) 2(4.75,0)
  silkscreen extent -5.77,-2.43 5.77,2.43, body extent -6.35,-2.35 6.35,2.35, height 4.2
AVAG-HLMP-4740 [mm] "THD, 2-Leads, Dia 5.845mm, Pitch 2.54mm"
  round 1.55 hole 1.05: 1(-1.27,0) 2(1.27,0)
  silkscreen extent -3.92,-2.92 2.92,2.92
"BOURNS SRP5030T" [mm] "Precision Wire Wound Inductor, 2-Leads, Body 5.70x5.20mm, IPC Medium Density"
  rect 2x1.8 smd: 1(-2.25,0) 2(2.25,0)
  silkscreen extent -2.5,-2.6 2.5,2.6, body extent -2.85,-2.6 2.85,2.6, height 3
"CAP 0603_1608" [mm] "Chip Capacitor, 2-Leads, Body 1.60x0.80mm, IPC Medium Density"
  rect 0.9x1 smd: 1(-0.675,0) 2(0.675,0)
  silkscreen extent -1.4,-0.7 1.4,0.7, body extent -0.8,-0.41 0.8,0.41, height 0.82
"CAP 0805_2012" [mm] "Chip Capacitor, 2-Leads, Body 2.00x1.20mm, IPC Medium Density"
  rect 1.3x1.4 smd: 1(-0.8,0) 2(0.8,0)
  silkscreen extent -1.7,-0.9 1.7,0.9, body extent -1,-0.64 1,0.64, height 1.26
FP-826925-5-MFG [mm]
  rect 1.55x1.55 hole 1 paste-1000 mask+0: 1(-5.08,-1.27)
  round 1.55 hole 1 paste-1000 mask+0: 2(-5.08,1.27) 3(-2.54,-1.27) 4(-2.54,1.27) 5(0,-1.27) 6(0,1.27) 7(2.54,-1.27) 8(2.54,1.27) 9(5.08,-1.27) 10(5.08,1.27)
  silkscreen extent -7.32,-2.6 6.6,2.6, body extent -6.7,-2.7 6.7,2.7, height 0.25
FP-B2B-XH-A_LF_SN-MFG [mm]
  rect 1.55x1.55 hole 1 paste-1000 mask+0: 1(-1.25,0.525)
  round 1.55 hole 1 paste-1000 mask+0: 2(1.25,0.525)
  silkscreen extent -4.5,-2.88 3.7,2.88, body extent -3.8,-2.98 3.8,2.98, height 0.25
FP-C04-057-SN-IPC_C [mil]
  rect 69.96x21.34 smd paste+0 mask+0: 1(-91.24,75)
  rrect100% 69.96x21.34 smd paste+0 mask+0: 2(-91.24,25) 3(-91.24,-25) 4(-91.24,-75) 5(91.24,-75) 6(91.24,-25) 7(91.24,25) 8(91.24,75)
  silkscreen extent -151,-96 37,96, body extent -130,-100 130,100, height 10
FP-GRM188-0_1-e0_2_0_5-MFG [mm]
  rect 0.65x0.7 smd paste+0 mask+0: 1(-0.675,0) 2(0.675,0)
  silkscreen extent -0.85,-0.75 0.85,0.75, body extent -1.1,-0.55 1.1,0.55, height 0.25
FP-LQFP100-1L-MFG [mm]
  rect 1.2x0.3 smd paste+0 mask+0: 1(-7.75,6) 2(-7.75,5.5) 3(-7.75,5) 4(-7.75,4.5) 5(-7.75,4) 6(-7.75,3.5) 7(-7.75,3) 8(-7.75,2.5) 9(-7.75,2) 10(-7.75,1.5) 11(-7.75,1) 12(-7.75,0.5) 13(-7.75,0) 14(-7.75,-0.5) 15(-7.75,-1) 16(-7.75,-1.5) 17(-7.75,-2) 18(-7.75,-2.5) 19(-7.75,-3) 20(-7.75,-3.5) 21(-7.75,-4) 22(-7.75,-4.5) 23(-7.75,-5) 24(-7.75,-5.5) 25(-7.75,-6) 51(7.75,-6) 52(7.75,-5.5) 53(7.75,-5) 54(7.75,-4.5) 55(7.75,-4) 56(7.75,-3.5) 57(7.75,-3) 58(7.75,-2.5) 59(7.75,-2) 60(7.75,-1.5) 61(7.75,-1) 62(7.75,-0.5) 63(7.75,0) 64(7.75,0.5) 65(7.75,1) 66(7.75,1.5) 67(7.75,2) 68(7.75,2.5) 69(7.75,3) 70(7.75,3.5) 71(7.75,4) 72(7.75,4.5) 73(7.75,5) 74(7.75,5.5) 75(7.75,6)
  rect 0.3x1.2 smd paste+0 mask+0: 26(-6,-7.75) 27(-5.5,-7.75) 28(-5,-7.75) 29(-4.5,-7.75) 30(-4,-7.75) 31(-3.5,-7.75) 32(-3,-7.75) 33(-2.5,-7.75) 34(-2,-7.75) 35(-1.5,-7.75) 36(-1,-7.75) 37(-0.5,-7.75) 38(0,-7.75) 39(0.5,-7.75) 40(1,-7.75) 41(1.5,-7.75) 42(2,-7.75) 43(2.5,-7.75) 44(3,-7.75) 45(3.5,-7.75) 46(4,-7.75) 47(4.5,-7.75) 48(5,-7.75) 49(5.5,-7.75) 50(6,-7.75) 76(6,7.75) 77(5.5,7.75) 78(5,7.75) 79(4.5,7.75) 80(4,7.75) 81(3.5,7.75) 82(3,7.75) 83(2.5,7.75) 84(2,7.75) 85(1.5,7.75) 86(1,7.75) 87(0.5,7.75) 88(0,7.75) 89(-0.5,7.75) 90(-1,7.75) 91(-1.5,7.75) 92(-2,7.75) 93(-2.5,7.75) 94(-3,7.75) 95(-3.5,7.75) 96(-4,7.75) 97(-4.5,7.75) 98(-5,7.75) 99(-5.5,7.75) 100(-6,7.75)
  silkscreen extent -9.08,-7.1 7.1,7.1, body extent -8.45,-8.45 8.45,8.45, height 0.25
FP-RMCF0603-MFG [mm]
  rect 0.65x0.9 smd paste+0 mask+0: 1(-0.725,0) 2(0.725,0)
  silkscreen extent -0.85,-0.85 0.85,0.85, body extent -1.15,-0.58 1.15,0.58, height 0.25
FP-SOT403-1-MFG [mm]
  rect 1.35x0.6 smd paste-1000 mask+0: 1(-2.925,2.375) 8(-2.925,-2.375) 9(2.925,-2.375) 16(2.925,2.375)
  rect 1.35x0.4 smd paste-1000 mask+0: 2(-2.925,1.625) 3(-2.925,0.975) 4(-2.925,0.325) 5(-2.925,-0.325) 6(-2.925,-0.975) 7(-2.925,-1.625) 10(2.925,-1.625) 11(2.925,-0.975) 12(2.925,-0.325) 13(2.925,0.325) 14(2.925,0.975) 15(2.925,1.625)
  silkscreen extent -4.32,-2.55 1.88,2.55, body extent -3.72,-2.9 3.72,2.9, height 0.25
FP-SS312SAH4-R-MFG [mm]
  rect 2.55x1 smd paste+0 mask+0: 1(2.825,-2) 2(2.825,0) 3(2.825,2)
  rect 1.7x1.7 smd paste+0 mask+0: 4(-0.65,4.9) 5(-0.65,-4.9)
  silkscreen extent 0.58,-4.6 4.78,4.6, body extent -4.1,-5.85 4.2,5.85, height 0.25
INSE-I62-16 [mm] "LGA, 16-Leads, Body 3x3mm, Pitch 0.5mm"
  rect 0.35x0.25 smd: 1(-1.225,1) 2(-1.225,0.5) 3(-1.225,0) 4(-1.225,-0.5) 5(-1.225,-1) 9(1.225,-1) 10(1.225,-0.5) 11(1.225,0) 12(1.225,0.5) 13(1.225,1)
  rect 0.25x0.35 smd: 6(-0.5,-1.225) 7(0,-1.225) 8(0.5,-1.225) 14(0.5,1.225) 15(0,1.225) 16(-0.5,1.225)
  body extent -1.5,-1.5 1.5,1.5, height 0.8
"NKK AB11AH-HC" [mm]
  round 2 hole 0.8: 1(2.54,-5.08) 2(2.54,0) 3(-2.54,-5.08) 4(-2.54,0)
  silkscreen extent -4.9,-4.34 4.9,8.76, body extent -4.9,-5.39 4.9,15.08, height 7.06
"RES 0603_1608" [mm] "Chip Resistor, 2-Leads, Body 1.60x0.80mm, IPC Medium Density"
  rect 0.85x0.95 smd: 1(-0.65,0) 2(0.65,0)
  silkscreen extent -1.27,-0.7 1.27,0.7, body extent -0.8,-0.4 0.8,0.4, height 0.45
"RES 0805_2012" [mm] "Chip Resistor, 2-Leads, Body 2.00x1.25mm, IPC Medium Density"
  rect 1.15x1.35 smd: 1(-0.875,0) 2(0.875,0)
  silkscreen extent -1.7,-0.9 1.7,0.9, body extent -1,-0.62 1,0.63, height 0.6
RES_AC01_VIS [mil]
  rect 63x63 / inner round 60 / far side rect 63x63 hole 43 paste-31.5 mask+0: 1(0,0)
  round 63 / inner round 60 / far side round 63 hole 43 paste-31.5 mask+0: 2(777,0)
  silkscreen extent -69,-90 610,90, body extent -16,-84 794,84, height 169
RESC2013X60X35ML10T20 [mm] "Chip Resistor, 2-Leads, Body 2.1x1.35mm, IPC Low Density"
  rect 1.2x1.45 smd: 1(-1,0) 2(1,0)
  silkscreen extent -0.1,-0.63 0.1,0.63, body extent -1.05,-0.68 1.05,0.67, height 0.6
RESC2013X60X40ML20T25 [mm] "Chip Resistor, 2-Leads, Body 2.00x1.25mm, IPC Low Density"
  rect 1.4x1.55 smd: 1(-0.95,0) 2(0.95,0)
  body extent -1.1,-0.72 1.1,0.72, height 0.6
RGT0016C_V [mm] "QFN, 16-Leads, Body 3x3mm, Pitch 0.5mm, Thermal Pad 1.65x1.65mm"
  rrect40% 0.6x0.25 smd: 1(-1.4,0.75) 2(-1.4,0.25) 3(-1.4,-0.25) 4(-1.4,-0.75) 9(1.4,-0.75) 10(1.4,-0.25) 11(1.4,0.25) 12(1.4,0.75)
  rrect40% 0.25x0.6 smd: 5(-0.75,-1.4) 6(-0.25,-1.4) 7(0.25,-1.4) 8(0.75,-1.4) 13(0.75,1.4) 14(0.25,1.4) 15(-0.25,1.4) 16(-0.75,1.4)
  rrect6% 1.55x1.55 on Top Paste: 17(0,0)
  rrect6% 1.7x1.7 smd paste-0.85: 17(0,0)
  silkscreen extent -2.35,-1.57 1.57,1.58, body extent -1.5,-1.5 1.5,1.5, height 1
SOIC127P600X175-8N [mm]
  rrect25% 1.97x0.57 smd: 1(-2.475,1.905) 2(-2.475,0.635) 3(-2.475,-0.635) 4(-2.475,-1.905) 5(2.475,-1.905) 6(2.475,-0.635) 7(2.475,0.635) 8(2.475,1.905)
  silkscreen extent -4.54,-2.51 2,2.57
SON50P200X200X100-9N [mm]
  rect 0.7x0.3 smd: 1(-1.05,0.75) 2(-1.05,0.25) 3(-1.05,-0.25) 4(-1.05,-0.75) 5(1.05,-0.75) 6(1.05,-0.25) 7(1.05,0.25) 8(1.05,0.75)
  rect 1x1.7 smd: 9(0,0)
  silkscreen extent -1.52,1.28 -1.27,1.52
SOT229P700X180-4N [mm]
  rrect15% 1.31x0.93 smd: 1(-3.345,2.29) 2(-3.345,0) 3(-3.345,-2.29)
  rrect15% 1.31x3.24 smd: 4(3.345,0)
  silkscreen extent -5.1,-3.25 1.75,3.25, body extent -3.5,-3.25 3.5,3.25, height 1.8
"TE 282834-2" [mm]
  oval 1.75x2.5 hole 1.1: 1(-1.27,0) 2(1.27,0)
  silkscreen extent -2.7,-3.2 2.7,3.2, body extent -2.77,-3.25 2.77,3.25, height 10
"TE 282834-6" [mm]
  oval 1.75x2.5 hole 1.1: 1(-6.35,0) 2(-3.81,0) 3(-1.27,0) 4(1.27,0) 5(3.81,0) 6(6.35,0)
  silkscreen extent -7.78,-3.2 7.78,3.2, body extent -7.85,-3.25 7.85,3.25, height 10
VISH-DO-214AC-2_L [mm] "DO-214AC, 2-Leads, Body 4.5x2.79mm, IPC High Density"
  rect 2.05x1.45 smd: 1(-1.425,0) 2(1.425,0)
  silkscreen extent -3.12,-1.4 2.25,1.4, body extent -2.25,-1.4 2.25,1.4, height 2.29

## Part data
1 2 3 4 "5V SIG" "12V SIG" EXTRA_GROUND_1 EXTRA_GROUND_2 EXTRA_GROUND_3 EXTRA_GROUND_4 J2 J3: "TERM BLK 6P SIDE ENT 2.54MM PCB", Color=Green, Current=10A, Manufacturer="TE Connectivity AMP Connectors", Supplier Part Number 1=A98337-ND, Voltage=150V, ComponentLink1Description=Datasheet, ComponentLink1URL=https://www.te.com/commerce/DocumentDelivery/DDEController?Action=srchrtrv&DocNm=282834&DocType=Customer+Drawing&DocLang=English, ComponentLink2Description="DigiKey Link", ComponentLink2URL=http://digikey.com/product-detail/en/te-connectivity-amp-connectors/282834-6/A98337-ND/1153267, LastUpdated="2020-01-15 4:16:31 AM", Lifecycle Status=Active, Mating Orientation="Horizontal with Board", Minimum Order=1, Mounting Type="Through Hole", Number of Levels=1, Packaging=Bulk, Part Number=282834-6, Part Status=Active, Pitch="0.100\" (2.54mm)", Positions Per Level=6, Price=4.72, Series=Buchanan, Supplier 1=DigiKey, Wire Gauge="16-30 AWG", Wire Termination="Screw - Rising Cage Clamp"
C1_Designator1 C1_Designator2 C1_Designator3 C1_Designator4 C1_Designator5 C1_Designator6 C1_Designator7 C1_Designator8 C1_Designator9 C4_Designator1 C4_Designator2 C4_Designator3 C4_Designator4 C4_Designator5 C4_Designator6 C4_Designator7 C4_Designator8 C4_Designator9: library part LGC26D105MAT2S1, "CAP CER 1UF 6.3V X5R 0805", Device Package="0805 (2012 Metric)", Manufacturer="AVX Corporation", Operating Temperature="-55°C ~ 85°C", Supplier Part Number 1=478-6694-1-ND, Temperature Coefficient=X5R, Tolerance=±20%, Voltage - Rated=6.3V, Applications="Bypass, Decoupling", Capacitance=1µF, ComponentLink1Description=Datasheet, ComponentLink1URL=http://datasheets.avx.com/LGA.pdf, ComponentLink2Description="DigiKey Link", ComponentLink2URL=http://digikey.com/product-detail/en/avx-corporation/LGC26D105MAT2S1/478-6694-1-ND/2694148, Features="Low ESL (Multi-Terminal)", LastUpdated="2020-09-02 1:04:42 AM", Lifecycle Status=Active, Minimum Order=1, Mounting Type="Surface Mount, MLCC", Package / Case="0805 (2012 Metric)", Packaging=TapeAndReel, Part Number=LGC26D105MAT2S1, Part Status=Active, partid=2463, Price=0.63, Series="LGC2 (LGA)", Size / Dimension="0.081\" L x 0.052\" W (2.06mm x 1.32mm)", Supplier 1=DigiKey, Thickness (Max)="0.022\" (0.55mm)"
C2_Designator1 C2_Designator2 C2_Designator3 C2_Designator4 C2_Designator5 C2_Designator6 C3_1 C3_2 C3_3 C3_4 C3_5 C3_6 C6_Designator1 C6_Designator2 C6_Designator3 C6_Designator4 C6_Designator5 C6_Designator6 C6_Designator7 C6_Designator8 C6_Designator9 C11 C19 C21 C26_CAN1 C26_CAN2 C38_CAN1 C38_CAN2: library part CC0805MRX7R9BB104, "CAP CER 0.1UF 50V X7R 0805", Device Package="0805 (2012 Metric)", Manufacturer=Yageo, Operating Temperature="-55°C ~ 125°C", Supplier Part Number 1=311-4351-1-ND, Temperature Coefficient=X7R, Tolerance=±20%, Voltage - Rated=50V, Applications="General Purpose", Capacitance="0.1 µF", ComponentLink1Description=Datasheet, ComponentLink1URL=https://www.yageo.com/upload/media/product/productsearch/datasheet/mlcc/UPY-GPHC_X7R_6.3V-to-50V_18.pdf, ComponentLink2Description="DigiKey Link", ComponentLink2URL=https://www.digikey.com/en/products/detail/yageo/CC0805MRX7R9BB104/5884281, Lifecycle Status=Active, Minimum Order=1, Mounting Type="Surface Mount, MLCC", Package / Case="0805 (2012 Metric)", Packaging=TapeAndReel, Part Number=CC0805MRX7R9BB104, Part Status=Active, partid=2475, Price=0.01, Series=CC, Size / Dimension="0.079\" L x 0.049\" W (2.00mm x 1.25mm)", Supplier 1=DigiKey, Thickness (Max)="0.037\" (0.95mm)"
  C2_Designator1 C2_Designator2 C2_Designator3 C2_Designator4 C2_Designator5 C2_Designator6 C3_1 C3_2 C3_3 C3_4 C3_5 C3_6 C6_Designator1 C6_Designator2 C6_Designator3 C6_Designator4 C6_Designator5 C6_Designator6 C6_Designator7 C6_Designator8 C6_Designator9 C19 C21: LastUpdated="2023-10-02 7:13:07 PM"
  C11: LastUpdated="2023-10-22 7:13:44 PM"
  C26_CAN1 C26_CAN2 C38_CAN1 C38_CAN2: LastUpdated="2023-10-12 7:14:35 PM"
C5_Designator1 C5_Designator2 C5_Designator3 C5_Designator4 C5_Designator5 C5_Designator6 C5_Designator7 C5_Designator8 C5_Designator9: library part MM055C224KCZ2A, "CAP CER 0.22UF 50V X7R 0805", Device Package="0805 (2012 Metric)", Manufacturer="AVX Corporation", Operating Temperature="-55°C ~ 125°C", Supplier Part Number 1=478-10609-1-ND, Temperature Coefficient=X7R, Tolerance=±10%, Voltage - Rated=50V, Applications="Medical, Non-Critical", Capacitance=0.22µF, ComponentLink1Description=Datasheet, ComponentLink1URL=http://datasheets.avx.com/AVX-MM.pdf, ComponentLink2Description="DigiKey Link", ComponentLink2URL=http://digikey.com/product-detail/en/avx-corporation/MM055C224KCZ2A/478-10609-1-ND/7344870, LastUpdated="2020-09-02 1:04:42 AM", Lifecycle Status=Active, Minimum Order=1, Mounting Type="Surface Mount, MLCC", Package / Case="0805 (2012 Metric)", Packaging=TapeAndReel, Part Number=MM055C224KCZ2A, Part Status=Active, partid=2435, Price=0.50, Series=MM, Size / Dimension="0.079\" L x 0.049\" W (2.01mm x 1.25mm)", Supplier 1=DigiKey, Thickness (Max)="0.029\" (0.74mm)"
C7_5VLS1 C7_5VLS2 C7_5VLS3 C7_5VLS4 C7_5VLS5 C7_5VLS6 C35 C36 C37: library part MM05ZC105KCZ2A, "CAP CER 1UF 10V X7R 0805", Part Number=MM05ZC105KCZ2A